# Altium PCB PMI_Action.PcbDoc
Units mil, origin at the board's own origin, x right, y up, seen from the top; angles counter-clockwise.
Board outline 3188.98 x 2283.46 mil, 2 copper layers (Top Layer, Bottom Layer); 93 components, 80 nets, 280 pads, 44 vias.
Unrouted connection lines stored in the file: 1.
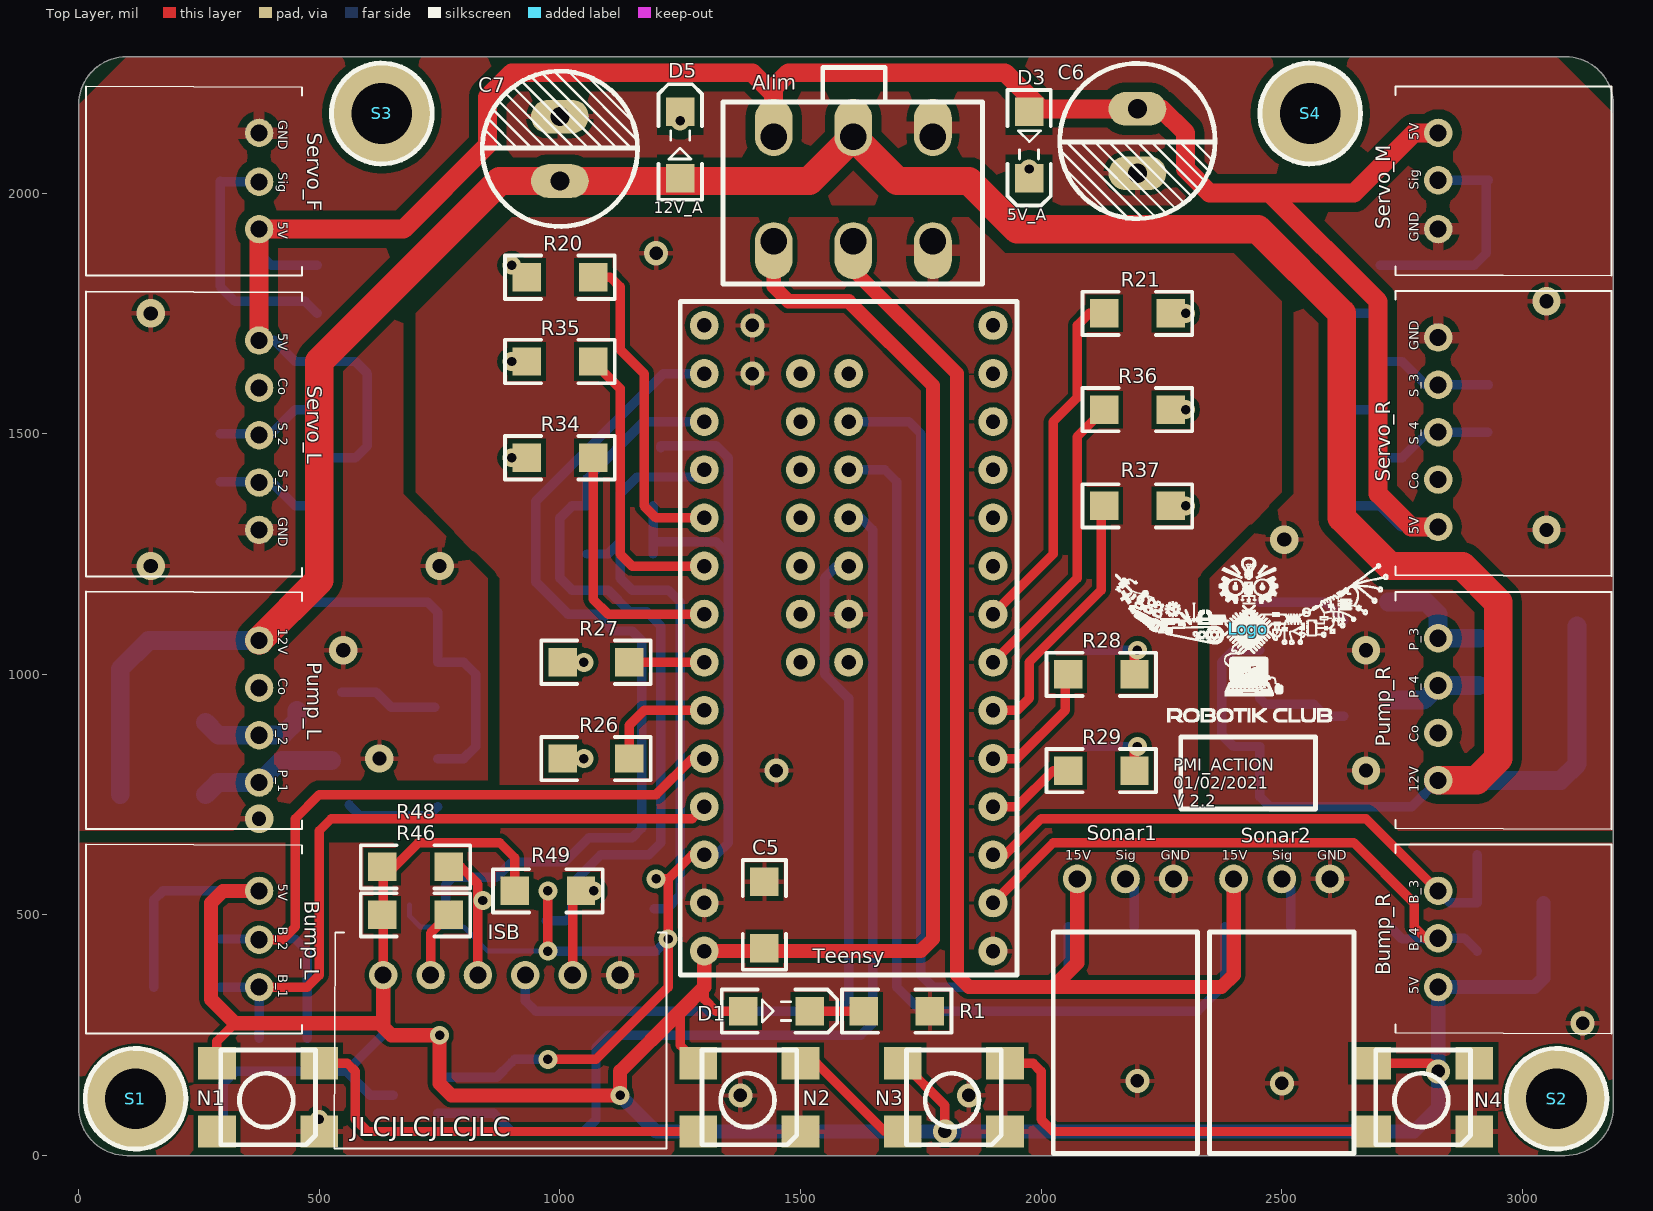
[diagram p0: Top Layer view]
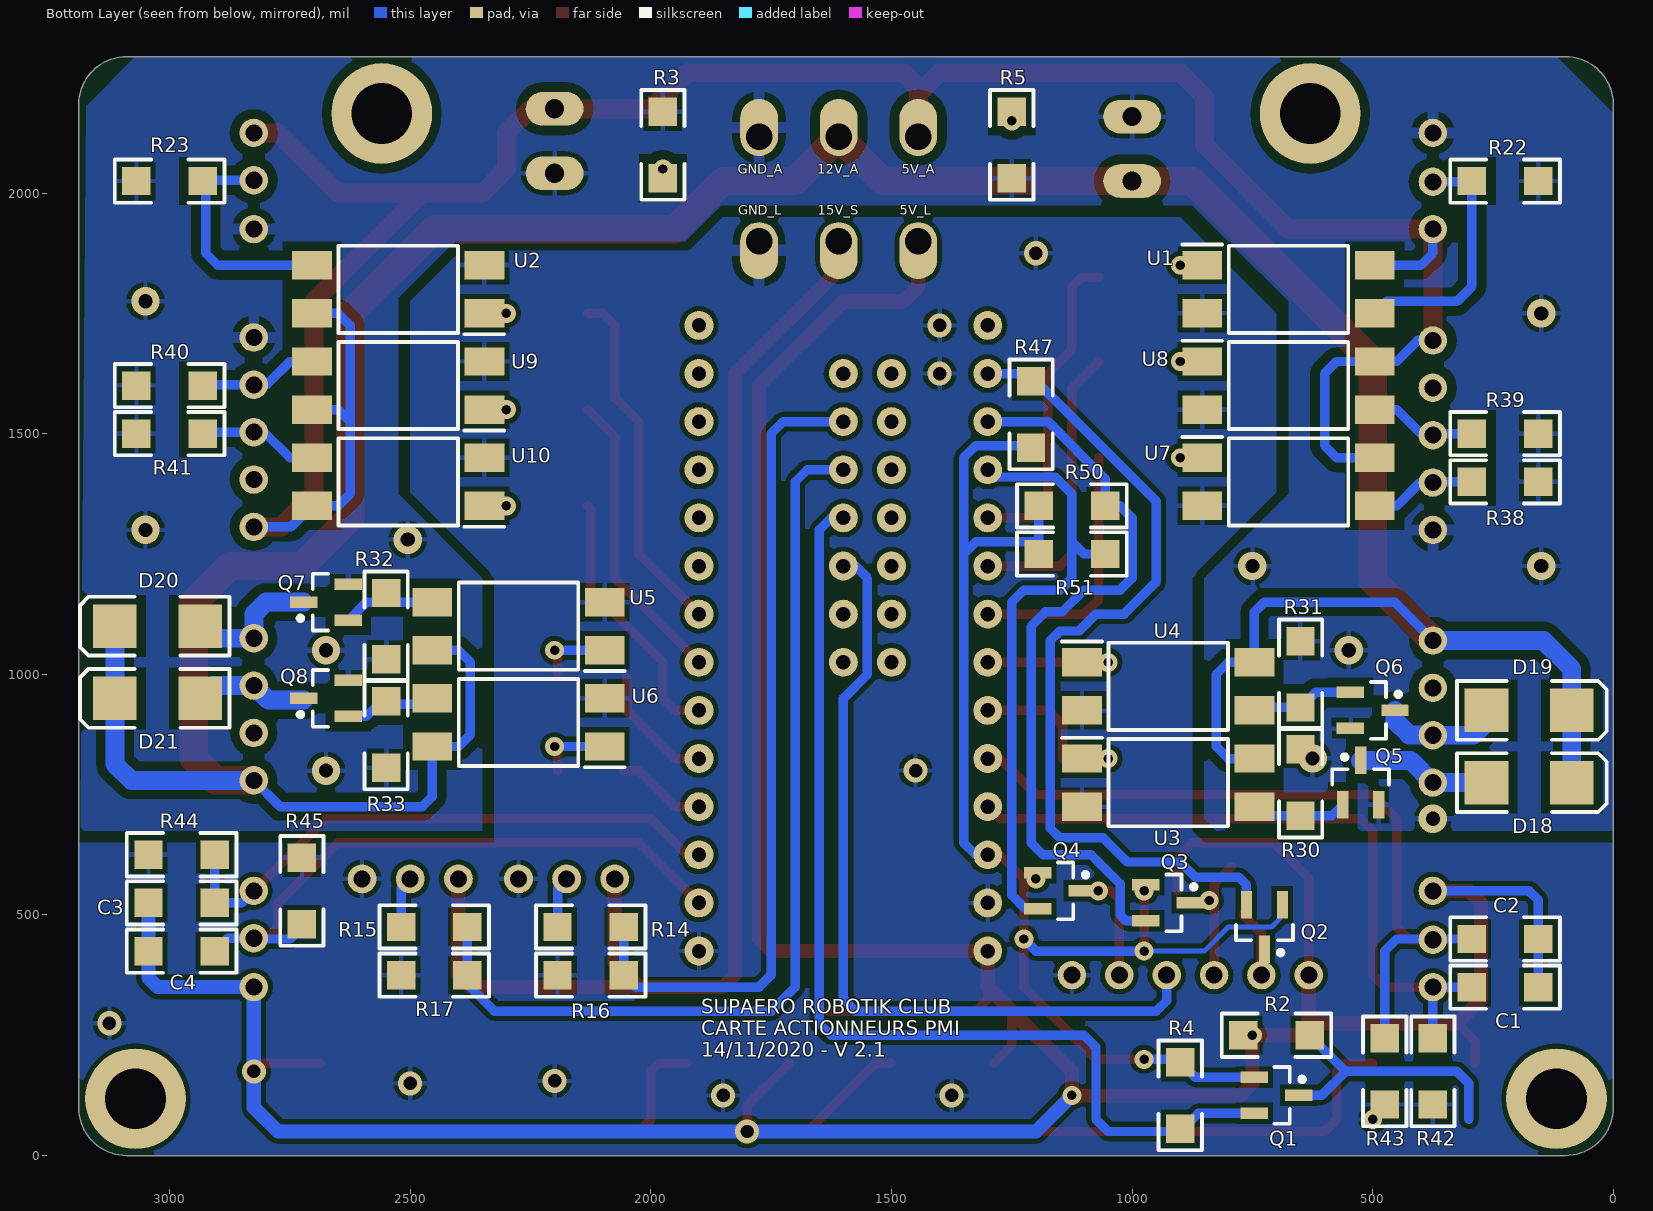
[diagram p1: Bottom Layer view, seen from below]

## Layer stack, top to bottom
Top Solder: solder mask 0.4, Solder Resist, Dk 3.5
Top Layer: signal copper 1.4
Dielectric 1: dielectric 12.6, FR-4, Dk 4.8
Bottom Layer: signal copper 1.4
Bottom Solder: solder mask 0.4, Solder Resist, Dk 3.5

## Board outline
0,118.11 0,2183.46 cw(c100,2183.46) 100,2283.46 118.11,2283.46 3088.98,2283.46 cw(c3088.98,2183.46) 3188.98,2183.46 3188.98,1771.65 3188.98,100 cw(c3088.98,100) 3088.98,0 2007.87,0 100,0 cw(c100,100) 0,100 0,157.48

## Design rules (kind name [scope] priority, off if disabled: settings)
Clearance Clearance_GND_A [InNet('GND_A')] p1: gap=10 except(19.68: Arc-Poly Track-Poly SMDPad-Poly THPad-Poly Via-Poly Fill-Poly Poly-Poly Poly-Region Poly-Text)
Clearance [All] p2: gap=10 except(29.53: Poly-Poly)
ComponentClearance ComponentClearance_Logo [InComponent('Logo')] p1: gap=0 collisioncheckmode=3 verticalgap=0 showdistances=FALSE
ComponentClearance ComponentClearance_1206_C [HasFootprint('Capacitor 1206')] p2: gap=0 collisioncheckmode=3 verticalgap=0 showdistances=FALSE
ComponentClearance ComponentClearance_1206_DD [HasFootprint('SMB')] p3: gap=0 collisioncheckmode=3 verticalgap=0 showdistances=FALSE
ComponentClearance ComponentClearance_1206_R [HasFootprint('Resistor 1206')] p4: gap=0 collisioncheckmode=3 verticalgap=0 showdistances=FALSE
ComponentClearance ComponentClearance_1206_D [HasFootprint('KP-3216SEC')] p5: gap=0 collisioncheckmode=3 verticalgap=0 showdistances=FALSE
ComponentClearance [All] p6: gap=10 collisioncheckmode=3 verticalgap=10 showdistances=FALSE
PolygonConnect PolygonConnect_Minifit [HasFootprint('MOLEX_MINIFITJR_3X2')] p1: connectstyle=Relief reliefconductorwidth=23.62 reliefentries=4 polygonreliefangle="90 Angle" airgapwidth=15.75
PolygonConnect PolygonConnect_GND_A [InNet('GND_A') vs HasFootprint('MOLEX_MINIFITJR_3X2') Or HasFootprint('S5B-XH-A') Or HasFootprint('S4B-XH-A' )Or HasFootprint('S3B-XH-A')] p2: connectstyle=Relief reliefconductorwidth=23.62 reliefentries=4 polygonreliefangle="90 Angle" airgapwidth=15.75
PolygonConnect [All] p3: connectstyle=Relief reliefconductorwidth=10 reliefentries=4 polygonreliefangle="90 Angle" airgapwidth=10
RoutingVias [All] p1: holewidth=28 width=50 viastyle="Through Hole" minholewidth=28 minwidth=50 maxholewidth=28 maxwidth=50
SilkToSilkClearance [All] p1 off: silktosilkclearance=10
SolderMaskExpansion [All] p1: expansion=4
Width [All] p1: maxlimit=78.74 minlimit=9.84 preferedwidth=19.68
28 further rules are at their usual default settings.

## Classes and differential pairs
component class PMI_Action_Octopus: Bump_L Bump_R C1 C2 C3 C4 D18 D19 D20 D21 Pump_L Pump_R Q5 Q6 Q7 Q8 R26 R27 R28 R29 R30 R31 R32 R33 R34 R35 R36 R37 R38 R39 R40 R41 R42 R43 R44 R45 R54 R57 R60 R61 R62 R63 R64 R65 R66 R69 Servo_L Servo_R U3 U4 U5 U6 U7 U8 U9 U10
component class PMI_Action: Alim C5 C6 C7 D1 D3 D5 ISB N1 N2 N3 N4 Q1 Q2 Q3 Q4 R1 R2 R3 R4 R5 R14 R15 R16 R17 R20 R21 R22 R23 R46 R47 R48 R49 R50 R51 S1 S2 S3 S4 Servo_F Servo_M Sonar1 Sonar2 Teensy U1 U2

## Components (designator, comment, footprint, x,y, rotation, side; value= is the part's Value field where it differs from the comment)
Alim "MinifitJr 3x2H" MOLEX_MINIFITJR_3X2 1775,1900 r180 top
Bump_L "Header 3H" S3B-XH-A 375,350 r90 top locked
Bump_R "Header 3H" S3B-XH-A 2825,550 r270 top locked
C1 "" "Capacitor 1206" 225,350 r180 bottom
C2 "" "Capacitor 1206" 225,450 r180 bottom
C3 "" "Capacitor 1206" 2975,525 r0 bottom
C4 "" "Capacitor 1206" 2975,425 r0 bottom
C5 "(Optinal)" "Capacitor 1206" 1425,500 r270 top
C6 "Cap2" Condensateur 2200,2175 r270 top
C7 "Cap2" Condensateur 1000,2025 r90 top
D1 "5V_L" KP-3216SEC 1450,300 r0 top
D3 "5V_A" KP-3216SEC 1975,2100 r270 top
D5 "12V_A" KP-3216SEC 1250,2100 r90 top
D18 "LGE SS12" SMB 175,775 r90 bottom
D19 "LGE SS12" SMB 175,925 r90 bottom
D20 "LGE SS12" SMB 3025,1100 r270 bottom
D21 "LGE SS12" SMB 3025,950 r270 bottom
ISB "Header 6H" S6B-XH-A 1125,375 r180 top locked
Logo "Comment" Logo_lowres 2430,1095 r0 top
N1 "WS2812C" ? 500,50 r180 top
N2 "WS2812C" ? 1500,50 r180 top
N3 "WS2812C" ? 1925,50 r180 top
N4 "WS2812C" ? 2900,50 r180 top
Pump_L "Header 4H" S4B-XH-A 375,775 r90 top locked
Pump_R "Header 4H" S4B-XH-A 2825,1075 r270 top locked
Q1 "MOSFET-N" SOT23_M 700,125 r180 bottom
Q2 "MOSFET-N" SOT23_M 725,475 r270 bottom
Q3 "MOSFET-N" SOT23_M 925,525 r180 bottom
Q4 "MOSFET-N" SOT23_M 1150,550 r180 bottom
Q5 "MOSFET-N" SOT23_M 525,775 r90 bottom
Q6 "MOSFET-N" SOT23_M 500,925 r180 bottom
Q7 "MOSFET-N" SOT23_M 2675,1150 r0 bottom
Q8 "MOSFET-N" SOT23_M 2675,950 r0 bottom
R1 "Res2" "Resistor 1206" 1700,300 r180 top
R2 "Res2" "Resistor 1206" 700,250 r0 bottom
R3 "Res2" "Resistor 1206" 1975,2100 r90 bottom
R4 "Res2" "Resistor 1206" 900,125 r90 bottom
R5 "Res2" "Resistor 1206" 1250,2100 r270 bottom
R14 "Res2" "Resistor 1206" 2125,475 r180 bottom
R15 "Res2" "Resistor 1206" 2450,475 r180 bottom
R16 "Res2" "Resistor 1206" 2125,375 r0 bottom
R17 "Res2" "Resistor 1206" 2450,375 r0 bottom
R20 "Res2" "Resistor 1206" 1000,1825 r0 top
R21 "Res2" "Resistor 1206" 2200,1750 r180 top
R22 "Res2" "Resistor 1206" 225,2025 r0 bottom
R23 "Res2" "Resistor 1206" 3000,2025 r180 bottom
R26 "Res2" "Resistor 1206" 1075,825 r0 top
R27 "Res2" "Resistor 1206" 1075,1025 r0 top
R28 "Res2" "Resistor 1206" 2125,1000 r180 top
R29 "Res2" "Resistor 1206" 2125,800 r180 top
R30 "Res2" "Resistor 1206" 650,775 r270 bottom
R31 "Res2" "Resistor 1206" 650,1000 r270 bottom
R32 "Res2" "Resistor 1206" 2550,1100 r90 bottom
R33 "Res2" "Resistor 1206" 2550,875 r90 bottom
R34 "Res2" "Resistor 1206" 1000,1450 r0 top
R35 "Res2" "Resistor 1206" 1000,1650 r0 top
R36 "Res2" "Resistor 1206" 2200,1550 r180 top
R37 "Res2" "Resistor 1206" 2200,1350 r180 top
R38 "Res2" "Resistor 1206" 225,1400 r0 bottom
R39 "Res2" "Resistor 1206" 225,1500 r0 bottom
R40 "Res2" "Resistor 1206" 3000,1600 r180 bottom
R41 "Res2" "Resistor 1206" 3000,1500 r180 bottom
R42 "Res2" "Resistor 1206" 375,175 r90 bottom
R43 "Res2" "Resistor 1206" 475,175 r90 bottom
R44 "Res2" "Resistor 1206" 2975,625 r180 bottom
R45 "Res2" "Resistor 1206" 2725,550 r270 bottom
R46 "Res2" "Resistor 1206" 700,500 r180 top
R47 "Res2" "Resistor 1206" 1210,1540 r270 bottom
R48 "Res2" "Resistor 1206" 700,600 r180 top
R49 "Res2" "Resistor 1206" 975,550 r180 top
R50 "Res2" "Resistor 1206" 1125,1350 r0 bottom
R51 "Res2" "Resistor 1206" 1125,1250 r0 bottom
S1 "Screw M3" "Screw M3" 118.11,118.11 r0 top
S2 "Screw M3" "Screw M3" 3070.87,118.11 r0 top
S3 "Screw M3" "Screw M3" 629.92,2165.35 r0 top
S4 "Screw M3" "Screw M3" 2559.06,2165.35 r0 top
Servo_F "S3B-XH-A" S3B-XH-A 375,1925 r90 top locked
Servo_L "Header 5H" S5B-XH-A 375,1300 r90 top locked
Servo_M "S3B-XH-A" S3B-XH-A 2825,2125 r270 top locked
Servo_R "Header 5H" S5B-XH-A 2825,1700 r270 top locked
Sonar1 "KK254" "MOLEX KK254 3X1H M" 2075,575 r0 top locked
Sonar2 "KK254" "MOLEX KK254 3X1H M" 2400,575 r0 top locked
Teensy "Teensy 3.2" TEENSY 2000,1225 r180 top locked
U1 "FOD817S" SOP254P1016X385-4N 675,1800 r180 bottom
U2 "FOD817S" SOP254P1016X385-4N 2525,1800 r0 bottom
U3 "FOD817S" SOP254P1016X385-4N 925,775 r180 bottom
U4 "FOD817S" SOP254P1016X385-4N 925,975 r180 bottom
U5 "FOD817S" SOP254P1016X385-4N 2275,1100 r0 bottom
U6 "FOD817S" SOP254P1016X385-4N 2275,900 r0 bottom
U7 "FOD817S" SOP254P1016X385-4N 675,1400 r180 bottom
U8 "FOD817S" SOP254P1016X385-4N 675,1600 r180 bottom
U9 "FOD817S" SOP254P1016X385-4N 2525,1600 r0 bottom
U10 "FOD817S" SOP254P1016X385-4N 2525,1400 r0 bottom

## Footprints (in the part's own frame and the unit in brackets; to place one, negate y for a bottom-side part, rotate by r counter-clockwise, add the part's x,y. Pads: shape width x height; smd on the part's side, far side on the other; paste and mask are expansions set on the pad)
"Capacitor 1206" [mm]
  rect 1.5x1.5 smd: 1(-1.75,0) 2(1.75,0)
  silkscreen extent -2.89,-1.14 2.89,1.14, body extent -1.98,-0.99 1.98,0.96, height 1.3
Condensateur [mil]
  oval 70x120 hole 40: 1(0,0) 2(133.86,0)
  silkscreen extent -94,-161 228,161, body extent -93,-160 227,160, height 500
KP-3216SEC [mm]
  rect 1.5x1.5 smd: 1(-1.75,0) 2(1.75,0)
  silkscreen extent -2.89,-1.14 3.2,1.14, body extent -1.7,-0.79 1.5,0.81, height 1.1
Logo_lowres [mil]
  silkscreen extent -276,-194 291,148
"MOLEX KK254 3X1H M" [mil]
  round 60 hole 35.43: 1(0,0) 2(100,0) 3(200,0)
  silkscreen extent -50,-571 250,-110, body extent -50,-570 250,11, height 230
MOLEX_MINIFITJR_3X2 [mm] "MOLEX_MINIFITJR_3X2, 39-28-1063"
  oval 2x3 hole 1.4 copper offset 0,0.5: 1(0,0) 3(4.2,0) 5(8.4,0)
  oval 2x3 hole 1.4 copper offset 0,-0.5: 2(0,-5.5) 4(4.2,-5.5) 6(8.4,-5.5)
  silkscreen extent -2.62,-9.17 11.07,2.26, body extent -3.1,-8.75 11.5,2.25, height 12.8
"Resistor 1206" [mm]
  rect 1.5x1.5 smd: 1(-1.75,0) 2(1.75,0)
  silkscreen extent -2.89,-1.14 2.89,1.14, body extent -1.98,-0.95 1.98,0.93, height 0.55
S3B-XH-A [mm]
  round 1.5 hole 0.9: 1(0,0) 2(2.5,0) 3(5.08,0)
  silkscreen extent -2.45,-2.26 7.54,9.14, body extent -2.44,-2.27 7.46,9.23, height 6.15
S4B-XH-A [mm]
  round 1.5 hole 0.9: 1(0,0) 2(2.5,0) 3(5,0) 4(7.5,0)
  silkscreen extent -2.45,-2.26 10.08,9.14, body extent -2.44,-2.32 9.96,9.18, height 6.15
S5B-XH-A [mm]
  round 1.5 hole 0.9: 1(0,0) 2(2.5,0) 3(5,0) 4(7.5,0) 5(10,0)
  silkscreen extent -2.45,-2.26 12.58,9.14, body extent -2.45,-2.3 12.45,9.2, height 6.15
S6B-XH-A [mm]
  round 1.5 hole 0.9: 1(0,0) 2(2.5,0) 3(5,0) 4(7.5,0) 5(10,0) 6(12.5,0)
  silkscreen extent -2.45,-2.26 15.08,9.14, body extent -2.45,-2.3 14.95,9.2, height 6.15
"Screw M3" [mm] "M3 iso Screw"
  round 5.32 hole 3.2 unplated: 0(0,0)
  silkscreen extent -2.66,-2.66 2.66,2.66
SMB [mm] "SMB Didoe"
  rect 2.3x2.3 smd: 1(0,2.25) 2(0,-2.25)
  silkscreen extent -1.55,-4.1 1.55,3.8, body extent -1.84,-2.67 1.78,2.62, height 2.2
SOP254P1016X385-4N [mm]
  rect 2.1x1.5 smd: 1(-4.55,1.27) 2(-4.55,-1.27) 3(4.55,-1.27) 4(4.55,1.27)
  silkscreen extent -5.6,-2.3 3.15,2.37, body extent -3.53,-1.4 3.48,1.44, height 2.21
SOT23_M [mm] "SOT23, 3-Leads, Body 2.9x1.3mm, Pitch 0.95mm, Lead Span 2.3mm - Reverse Pinning, IPC Low Density"
  rect 1.45x0.6 smd: 1(1.175,0) 2(-1.175,-0.95) 3(-1.175,0.95)
  silkscreen extent -0.1,-1.5 1.47,1.5, body extent -0.7,-1.5 0.7,1.5, height 1.1
TEENSY [mil] "Teensy 3.2"
  round 60 hole 30: 0(100,700) 1(100,600) 2(100,500) 3(100,400) 4(100,300) 5(100,200) 6(100,100) 7(100,0) 8(100,-100) 9(100,-200) 10(100,-300) 11(100,-400) 12(100,-500) 13(700,-500) 14(700,-400) 15(700,-300) 16(700,-200) 17(700,-100) 18(700,0) 19(700,100) 20(700,200) 21(700,300) 22(700,400) 23(700,500) 24(400,0) 25(400,-100) 26(400,-200) 27(400,-300) 28(400,-400) 29(500,-400) 30(500,-300) 31(500,-200) 32(500,-100) 33(500,0) 36(400,200) 37(500,200) 39(500,100) 40(400,100) 41(700,600) 42(700,700) 43(700,800) 44(100,800)
  silkscreen extent 50,-550 750,850, body extent 49,-561 753,904, height 468
? [mm]
  rect 2x1.7 smd: 1(5.4,-3.6) 2(5.4,0) 3(0,0) 4(0,-3.6)
  silkscreen extent 0.2,-4.3 5.2,0.7, body extent 0.19,-4.33 5.19,0.67, height 2

## Part data
Alim: library part "Header 3X2H", "Header, 3-Pin, Dual row, Right Angle"
Bump_L Bump_R: "Header, 3-Pin, Right Angle"
C1 C2 C3 C4 C5: library part Cap, "Capacitor"
C6 C7: "Capacitor"
D1 D3 D5: library part LED2, "Typical RED, GREEN, YELLOW, AMBER GaAs LED"
D18 D19 D20 D21: library part Diode, "Default Diode"
ISB: "Header, 6-Pin, Right Angle"
N1 N2 N3 N4: "Intelligent control LED"
Pump_L Pump_R: "Header, 4-Pin, Right Angle"
Q1 Q2 Q3 Q4 Q5 Q6 Q7 Q8: "N-Channel MOSFET"
R1 R2 R3 R4 R5 R14 R15 R16 R17 R20 R21 R22 R23 R26 R27 R28 R29 R30 R31 R32 R33 R34 R35 R36 R37 R38 R39 R40 R41 R42 R43 R44 R45 R46 R47 R48 R49 R50 R51: "Resistor"
Servo_F Servo_M Sonar1 Sonar2: library part "Header 3H", "Header, 3-Pin, Right Angle"
Servo_L Servo_R: "Header, 5-Pin, Right Angle"
Teensy: library part teensy3.2
U1 U2 U3 U4 U5 U6 U7 U8 U9 U10: library part Optoisolator1, "4-Pin Phototransistor Optocoupler"

## Via types
v1: diameter 39.37, hole 19.68, Top Layer to Bottom Layer, 22 vias
v2: diameter 50, hole 28, Top Layer to Bottom Layer, 11 vias
v3: diameter 59.06, hole 29.53, Top Layer to Bottom Layer, 11 vias

## Nets (pads, with @x,y where several pads share a name; then routed paths per layer and width w, separated by ;. In a path a pad name is that pad's centre, name@x,y a point inside that pad or via, vN(x,y) a via of type N, cw(c..) or ccw(c..) an arc to the next point about the centre after c; other vN are vias at no path point)
3V_L: Q1.3 Q2.3 Q3.3 Q4.3 R4.2 R47.2 R50.2 R51.2 Teensy.41 | length 2878.5
  Top Layer w19.68: v1(975,200) 1075,200 1225,350 1225,575 ; v1(975,425) v1(975,550) ; v1(1200,575) 1225,575 ; Teensy.41@1275,625 1225,575
  Bottom Layer w10: Q2.3 687.6,497.4 710,475 800,475 850,425 v1(975,425)
  Bottom Layer w19.68: Q1.3 868.5,162.4 R4.2 906.1,200 v1(975,200) ; v1(975,425) 1200,425 v1(1225,450) ; R51.2 R50.2 ; R51.2@1200,1275 1325,1275 1350,1250 ; R47.2 1210,1474.84 1325.16,1474.84 1350,1450 1350,1250 ; Teensy.41 1325,625 1350,650 1350,1250
5V_A: Alim.6 C6.1 D3.1 Servo_F.1 Servo_L.5 Servo_M.1 Servo_R.5 U1.4 U2.4 U7.4 U8.4 U9.4 U10.4 | length 5625
  Top Layer w39.37: Servo_L.5 Servo_F.1 675,1925 850,2100 850,2200 900,2250 1400,2250 1444.29,2205.71 Alim.6 1444.29,2219.29 1475,2250 1925,2250 2000,2175 2250,2175 2300,2125 2300,2050 2350,2000 2650,2000 2775,2125 Servo_M.1 ; 2475,2000 2700,1775 2700,1375 2768.7,1306.3 Servo_R.5
  Bottom Layer w19.68: Servo_L.5 406.3,1693.7 450,1650 U8.4 575,1650 600,1625 600,1475 575,1450 U7.4 ; Servo_F.1 375,1875 400,1850 U1.4 ; U9.4 2650,1550 2625,1525 ; U2.4 2650,1750 2625,1725 2625,1525 ; Servo_R.5 2747.83,1306.3 U10.4 2650,1350 2625,1375 2625,1525
5V_L: Alim.5 Bump_L.3 Bump_R.3 C1.2 C2.2 C3.2 C4.2 C5.2 D1.1 ISB.6 N1.1 N2.1 N3.1 N4.1 R2.2 R46.2 R48.2 R49.2 Teensy.43 | length 7968.9
  Top Layer w19.68: N1.1 287.4,237.4 325,275 ; ISB.6 632.87,576.77 706.1,650 875,650 906.1,618.9 R49.2 ; 1250,300 1250,229.13 N2.1 ; 1300,350 1300,325 1325,300 D1.1 ; N3.1 1800,104.13 v2(1800,50) ; N4.1 2808.27,191.73 v2(2825,175)
  Top Layer w29.53: Bump_L.3 300,550 275,525 275,325 325,275 625,275 632.87,267.13 ; ISB.6 632.87,267.13 ; Alim.5 1444.29,1805.71 1475,1775 1600,1775 1775,1600 1775,450 1750,425 Teensy.43 1300,350 1250,300 1125,175 v1(1125,125) 775,125 750,150 v1(750,250) 650,250 632.87,267.13
  Bottom Layer w19.68: C1.2 C2.2 156.1,531.1 175,550 Bump_L.3
  Bottom Layer w29.53: v1(1125,125) 1200,50 2775,50 2825,100 v2(2825,175) Bump_R.3 3025,350 3043.9,368.9 C3.2
12V_A: Alim.4 C7.1 D5.1 D18.2 D19.2 D20.2 D21.2 Pump_L.4 Pump_R.4 U3.4 U4.4 U5.4 U6.4 | length 7237.1
  Top Layer w59.06: Pump_L.4 500,1195.28 500,1650 875,2025 1518.11,2025 Alim.4 1701.18,2025 1850,2025 1950,1925 2450,1925 2625,1750 2625,1325 2725,1225 2875,1225 2950,1150 2950,825 2904.72,779.72 Pump_R.4
  Bottom Layer w19.68: Pump_L.4 454.72,1150 725,1150 745.87,1129.13 U4.4 800,1025 825,1000 825,850 800,825 U3.4 ; U5.4 2400,1050 2375,1025 2375,875 2400,850 U6.4 2454.13,745.87 2475,725 2770.28,725 Pump_R.4
  Bottom Layer w39.37: D18.2@86.42,750 86.42,1011.42 145.28,1070.28 Pump_L.4 ; Pump_R.4 3079.72,779.72 3113.58,813.58 D20.2
15V_S: Alim.3 Sonar1.1 Sonar2.1 | length 2655.6
  Top Layer w29.53: Alim.3 1609.65,1840.35 1825,1625 1825,375 1850,350 2025,350 ; Sonar1.1 2075,400 2025,350 ; Sonar2.1 2400,375 2375,350 2025,350
BUMP_1: Bump_L.1 C1.1 R42.2 Teensy.23 | length 1443.3
  Top Layer w19.68: Bump_L.1 475,350 500,375 500,675 525,700 1275,700 Teensy.23
  Bottom Layer w19.68: C1.1 Bump_L.1 R42.2
BUMP_2: Bump_L.2 C2.1 R43.2 Teensy.22 | length 1585.3
  Top Layer w19.68: Bump_L.2 423.43,448.43 450,475 450,700 500,750 1200,750 1275,825 Teensy.22
  Bottom Layer w19.68: C2.1 450,450 475,425 R43.2
BUMP_3: Bump_R.1 C3.1 R44.2 Teensy.1 | length 1209.7
  Top Layer w19.68: Teensy.1 1925,625 2000,700 2675,700 Bump_R.1
  Bottom Layer w19.68: Bump_R.1 2850,525 C3.1 R44.2
BUMP_4: Bump_R.2 C4.1 R45.2 Teensy.0 | length 1290.7
  Top Layer w19.68: Teensy.0 2025,650 2650,650 2775,525 2775,475 2798.43,451.57 Bump_R.2
  Bottom Layer w19.68: R45.2@2725,475 2750,450 Bump_R.2@2825,450 ; Bump_R.2 2879.53,451.57 C4.1
GND_A: Alim.2 C6.2 C7.2 Q5.2 Q6.2 Q7.2 Q8.2 R3.2 R5.2 R22.1 R23.1 R30.1 R31.1 R32.1 R33.1 R38.1 R39.1 R40.1 R41.1 Servo_F.3 Servo_L.1 Servo_M.3 Servo_R.1
  other v3: 375,700 2675,800 625,825 550,1050 2675,1050 150,1225 750,1225 2505,1280 3050,1300 150,1750 3050,1775
GND_L: Alim.1 C5.1 ISB.1 N1.3 N2.3 N3.3 N4.3 R1.1 R16.2 R17.2 R42.1 R43.1 R44.1 R45.1 Sonar1.3 Sonar2.3 Teensy.40 Teensy.42 Teensy.44 U1.2 U2.2 U3.2 U4.2 U5.2 U6.2 U7.2 U8.2 U9.2 U10.2
  other v1: 500,75
  other v2: 1375,125 1850,125 2500,150 2200,155 3125,275 1450,800 1400,1625 1400,1725 1200,1875
ISB_CLOCK: ISB.2 Q4.1 R49.1 | length 182.2
  Top Layer w19.68: ISB.2 1026.57,532.68 R49.1
  other v1: 1070,550
ISB_LOADING: ISB.4 Q3.1 R48.1 | length 239.8
  Top Layer w19.68: R48.1@793.9,600 829.72,564.17 ISB.4
  other v1: 840,530
ISB_NEOPIXEL: ISB.5 Q2.1 R46.1 | length 140.6
  Top Layer w19.68: ISB.5 731.3,462.4 R46.1
NEOPIXEL: N4.4 Q1.1 R2.1 | length 565.9
  Bottom Layer w19.68: 300,75 300,150 325,175 556.1,175 ; R2.1 556.1,175 ; Q1.1 606.1,125 556.1,175
NetD1_2: D1.2 R1.2 | length 112.2
  Top Layer w19.68: D1.2 R1.2
NetD3_2: D3.2 R3.1
  other v1: 1975,2050
NetD5_2: D5.2 R5.1
  other v1: 1250,2150
NetD6_2: 
NetD7_2: 
NetD8_2: 
NetD9_2: 
NetD10_2: 
NetD11_2: 
NetD12_2: 
NetD13_2: 
NetD14_2: 
NetD15_2: 
NetD16_2: 
NetD17_2: 
NetN1_4: N1.4 N2.2 | length 904.7
  Top Layer w19.68: N1.4 558.27,191.73 575,175 575,75 600,50 N2.2
NetN2_4: N2.4 N3.2 | length 271.1
  Top Layer w19.68: N2.4 1533.27,191.73 1675,50 N3.2
NetN3_4: N3.4 N4.2 | length 879.7
  Top Layer w19.68: N3.4 1983.27,191.73 2000,175 2000,75 2025,50 N4.2
NetQ5_2: Q5.3 R30.2 U3.3 | length 200.7
  Bottom Layer w19.68: Q5.3 585.04,706.1 R30.2 726.97,706.1 U3.3
NetQ6_2: Q6.3 R31.2 U4.3 | length 206.5
  Bottom Layer w19.68: Q6.3 618.7,962.4 R31.2 U4.3@739.76,931.1
NetQ7_2: Q7.3 R32.2 U5.3 | length 190.2
  Bottom Layer w19.68: U5.3 2591.14,1150 Q7.3@2628.74,1112.4
NetQ8_2: Q8.3 R33.2 U6.3 | length 190.1
  Bottom Layer w19.68: U6.3 2466.73,937.4 2566.54,937.4 2591.34,912.6 Q8.3
NetR20_1: R20.1 U1.1
  other v1: 900,1850
NetR21_1: R21.1 U2.1
  other v1: 2300,1750
NetR22_2: R22.2 Servo_F.2 U1.3 | length 523.6
  Bottom Layer w19.68: R22.2 293.9,1806.1 325,1775 470.87,1775 U1.3 ; R22.2@295.47,2023.43 Servo_F.2
NetR23_2: R23.2 Servo_M.2 U2.3 | length 489.2
  Bottom Layer w19.68: U2.3 2900,1850 2925,1875 2925,2022.05 2929.53,2026.57 Servo_M.2
NetR26_1: R26.1 U3.1
  other v1: 1050,825
NetR27_1: R27.1 U4.1
  other v1: 1050,1025
NetR28_1: R28.1 U5.1 | length 156.7
  Top Layer w19.68: R28.1 2193.9,1043.9 v1(2200,1050)
  Bottom Layer w19.68: U5.1 v1(2200,1050)
NetR29_1: R29.1 U6.1 | length 160.2
  Top Layer w19.68: R29.1 v1@2193.9,856.1
  Bottom Layer w19.68: U6.1 v1(2200,850)
NetR34_1: R34.1 U7.1
  other v1: 900,1450
NetR35_1: R35.1 U8.1
  other v1: 900,1650
NetR36_1: R36.1 U9.1
  other v1: 2300,1550
NetR37_1: R37.1 U10.1
  other v1: 2300,1350
PUMP_1: D18.1 Pump_L.1 Q5.1 | length 290.9
  Bottom Layer w39.37: D18.1@263.58,750 288.58,775 Pump_L.1 421.26,821.26 Q5.1
PUMP_2: D19.1 Pump_L.2 Q6.1 | length 235
  Bottom Layer w39.37: D19.1@263.58,900 290.16,873.43 Pump_L.2 375.94,874.37 424.37,874.37 453.74,903.74 Q6.1
PUMP_3: D20.1 Pump_R.1 Q7.1 | length 250.5
  Bottom Layer w39.37: Q7.1 2800,1150 2825,1125 Pump_R.1 D20.1@2911.42,1075
PUMP_4: D21.1 Pump_R.2 Q8.1 | length 201.1
  Bottom Layer w39.37: Q8.1@2721.26,946.26 2794.69,946.26 Pump_R.2 D21.1@2909.84,976.57
PUMP_L_CO: Pump_L.3
PUMP_R_CO: Pump_R.3
SERVO_1: R38.2 Servo_L.2 U7.3 | length 222.7
  Bottom Layer w19.68: R38.2 373.43,1400 Servo_L.2 401.57,1398.43 450,1350 U7.3
SERVO_2: R39.2 Servo_L.3 U8.3 | length 225.3
  Bottom Layer w19.68: R39.2 371.85,1500 Servo_L.3 396.85,1496.85 450,1550 U8.3
SERVO_3: R40.2 Servo_R.2 U9.3 | length 245.5
  Bottom Layer w19.68: U9.3 2750,1650 2798.43,1601.57 Servo_R.2 R40.2@2929.53,1601.57
SERVO_4: R41.2 Servo_R.3 U10.3 | length 245.8
  Bottom Layer w19.68: U10.3 2750,1450 2803.15,1503.15 Servo_R.3 R41.2@2927.95,1503.15
SERVO_L_CO: Servo_L.4
SERVO_R_CO: Servo_R.4
SONAR_1: R14.1 Sonar1.2 | length 107.8
  Bottom Layer w19.68: Sonar1.2 2193.9,556.1 R14.1
SONAR_2: R15.1 Sonar2.2 | length 107.8
  Bottom Layer w19.68: Sonar2.2 2518.9,556.1 R15.1
T_ISB_CLOCK: Q4.2 R51.1 Teensy.16 | length 1270
  Bottom Layer w19.68: R51.1 1100,1250 1125,1275 ; Q4.2 1221.26,512.6 1250,541.34 1250,1150 1225,1175 1150,1175 1125,1200 1125,1375 1160,1410 1285,1410 Teensy.16
T_ISB_LOADING: Q3.2 R50.1 Teensy.15 | length 1586
  Bottom Layer w19.68: Q3.2 1012.6,487.6 1025,500 1025,564.68 1085.32,625 1185,625 1210,650 1210,1100 1180,1130 1145,1130 1100,1175 1025,1175 1000,1200 1000,1325 1025,1350 R50.1 1056.1,1406.1 1175,1525 Teensy.15
T_ISB_NEOPIXEL: Q2.2 R47.1 Teensy.14 | length 1786.2
  Bottom Layer w19.68: Q2.2 762.4,562.6 778,578.2 868.2,578.2 900,610 1010,610 1060,660 1150,660 1170,680 1170,1070 1150,1090 1110,1090 1075,1125 1016.5,1125 950,1191.5 950,1360 1215,1625 Teensy.14
T_ISB_SERIAL: ISB.3 Teensy.24 | length 1700.5
  Bottom Layer w19.68: ISB.3 928.15,321.85 950,300 1575,300 1600,325 1600,950 1550,1000 1550,1200 1575,1225 Teensy.24
T_NEOPIXEL: Q1.2 R4.1 Teensy.25 | length 2185.7
  Bottom Layer w19.68: Q1.2 862.4,87.6 900,50 1050,50 1075,75 1075,225 1100,250 1625,250 1650,275 1650,1300 1625,1325 Teensy.25
T_PUMP_1: R26.2 Teensy.21 | length 237.9
  Top Layer w19.68: R26.2 1143.9,893.9 1175,925 Teensy.21
T_PUMP_2: R27.2 Teensy.20 | length 156.1
  Top Layer w19.68: R27.2 Teensy.20
T_PUMP_3: R28.2 Teensy.3 | length 260.3
  Top Layer w19.68: Teensy.3 1950,825 2050,925 R28.2@2050,993.9
T_PUMP_4: R29.2 Teensy.2 | length 187.2
  Top Layer w19.68: Teensy.2 1950,725 2025,800 R29.2
T_SERVO_1: R34.2 Teensy.19 | length 537.9
  Top Layer w19.68: R34.2 1068.9,1156.1 1100,1125 Teensy.19
T_SERVO_2: R35.2 Teensy.18 | length 608.6
  Top Layer w19.68: R35.2 1125,1593.9 1125,1250 1150,1225 Teensy.18
T_SERVO_3: R36.2 Teensy.5 | length 620.7
  Top Layer w19.68: Teensy.5 2075,1200 2075,1493.9 R36.2
T_SERVO_4: R37.2 Teensy.4 | length 550
  Top Layer w19.68: Teensy.4 1950,925 1975,950 1975,1025 2125,1175 2125,1343.9 R37.2
T_SERVO_F: R20.2 Teensy.17 | length 675.5
  Top Layer w19.68: R20.2 1105,1825 1125,1805 1125,1675 1175,1625 1175,1350 1200,1325 Teensy.17
T_SERVO_M: R21.2 Teensy.6 | length 738.9
  Top Layer w19.68: Teensy.6 2025,1250 2025,1525 2075,1575 2075,1725 2100,1750 R21.2
T_SONAR_1: R14.2 R16.1 Teensy.27 | length 1712.2
  Bottom Layer w19.68: Teensy.27 1725,1525 1750,1500 1750,375 1775,350 2031.1,350 R16.1 R14.2
T_SONAR_2: R15.2 R17.1 Teensy.26 | length 2004.3
  Bottom Layer w19.68: Teensy.26 1675,1425 1700,1400 1700,350 1750,300 2325,300 2381.1,356.1 R17.1 R15.2
pads on no net: N1.2 S1.0 S2.0 S3.0 S4.0 Teensy.7 Teensy.8 Teensy.9 Teensy.10 Teensy.11 Teensy.12 Teensy.13 Teensy.28 Teensy.29 Teensy.30 Teensy.31 Teensy.32 Teensy.33 Teensy.36 Teensy.37 Teensy.39

## Polygon pours and split planes (outlines as drawn)
GND_A on Bottom Layer "Bot GND_A" (solid, pour order 0): 3184.72,675 2350,675 2350,1200 2525,1375 2525,1782.88 2407.88,1900 1928.94,1900 1853.94,1975 875,1975 675,1775 675,1375 850,1200 850,700 825,675 0,675 0,2165.35 118.11,2283.46 3070.87,2283.46 3173.59,2180.75
GND_L on Bottom Layer "Bot GND_L" (solid, pour order 8): 130,0 3070.87,0 3188.98,118.11 3188.98,650 2325,650 2325,1200 2500,1375 2500,1775 2325,1950 900,1950 700,1750 700,1375 875,1200 875,675 850,650 0,650 0,130
GND_L on Top Layer "Bot GND_L" (solid, pour order 6): 118.11,1.65 3070.87,0 3188.98,118.11 3188.98,650 2325,650 2325,1200 2500,1375 2500,1775 2400,1875 1925,1875 1850,1950 900,1950 700,1750 700,1375 875,1200 875,650 0,650 0,157.48
GND_A on Top Layer "Bot GND_A" (solid, pour order 2): 3188.98,675 2350,675 2350,1200 2525,1375 2525,1775 2325,1975 875,1975 675,1775 675,1375 850,1200 850,675 0,675 0,2183.46 100,2283.46 3070.87,2283.46 3188.98,2165.35

## Silkscreen, mask and mechanical layers (free items; w line width, h text height)
Top Overlay:
  lines w10: 2290,720 2290,870 2570,870 2570,720 2290,720
  text "GND" at 415,2151.3 h20 r270
  text "5V" at 2785,2110 h20 r90
  text "Sig" at 415,2043.15 h20 r270
  text "Sig" at 2785,2006.85 h20 r90
  text "12V_A" at 1195,1950 h40
  text "5V" at 415,1940 h20 r270
  text "5V_A" at 1930,1935 h40
  text "GND" at 2785,1898.7 h20 r90
  text "5V" at 415,1708.7 h20 r270
  text "GND" at 2785,1673.7 h20 r90
  text "Co" at 415,1615 h20 r270
  text "S_3" at 2785,1575.28 h20 r90
  text "S_2" at 415,1523.15 h20 r270
  text "S_4" at 2785,1476.85 h20 r90
  text "S_2" at 415,1424.72 h20 r270
  text "Co" at 2785,1385 h20 r90
  text "GND" at 415,1326.3 h20 r270
  text "5V" at 2785,1291.3 h20 r90
  text "12V" at 415,1095 h20 r270
  text "P_3" at 2785,1048.7 h20 r90
  text "Co" at 415,991.57 h20 r270
  text "P_4" at 2785,950.28 h20 r90
  text "P_2" at 415,899.72 h20 r270
  text "Co" at 2785,858.43 h20 r90
  text "P_1" at 415,801.3 h20 r270
  text "12V" at 2785,755 h20 r90
  text "PMI_ACTION / 01/02/2021 / V 2.2" at 2275,725 h25
  text "15V" at 2050,615 h20
  text "Sig" at 2155.28,615 h20
  text "GND" at 2248.7,615 h20
  text "15V" at 2375,615 h20
  text "Sig" at 2480.28,615 h20
  text "GND" at 2573.7,615 h20
  text "5V" at 415,565 h20 r270
  text "B_3" at 2785,523.43 h20 r90
  text "B_2" at 415,475 h20 r270
  text "B_4" at 2785,425 h20 r90
  text "B_1" at 415,376.57 h20 r270
  text "5V" at 2785,335 h20 r90
  text "JLCJLCJLCJLC" at 565,40 h39.37
Bottom Overlay:
  text "5V_A" at 1478.7,2040 h20
  text "12V_A" at 1654.06,2040 h20
  text "GND_A" at 1819.41,2040 h20
  text "5V_L" at 1482.99,1955 h20
  text "15V_S" at 1653.35,1955 h20
  text "GND_L" at 1818.7,1955 h20
  text "SUPAERO ROBOTIK CLUB / CARTE ACTIONNEURS PMI / 14/11/2020 - V 2.1" at 1895,205 h30
Mechanical 2:
  lines w10: 0,118.11 ccw(c118.11,118.11) 118.11,0 3070.87,0 ccw(c3070.87,118.11) 3188.98,118.11 3188.98,2165.35 ccw(c3070.87,2165.35) 3070.87,2283.46 118.11,2283.46 ccw(c118.11,2165.35) 0,2165.35 0,118.11

## Dimensions
629.92,2165.35 to 118.11,2283.46 on Mechanical 3
100,0 to 118.11,118.11 on Mechanical 3
2559.06,2165.35 to 3188.98,1771.65 on Mechanical 3
629.92,2165.35 to 2559.06,2165.35 on Mechanical 3
0,157.48 to 629.92,2165.35 on Mechanical 3
118.11,2283.46 to 2007.87,0 on Mechanical 3
0,157.48 to 3188.98,100 on Mechanical 3